# Altium PCB PCB_ANALOG.PcbDoc (part 3 of 3)
Units mil, origin at the board's own origin, x right, y up, seen from the top; angles counter-clockwise.
Board outline 2560.08 x 1580 mil, 4 copper layers (Top Layer, Layer 2(GND), Layer 3(GND), Bottom Layer), stack 61.583 mil thick; 99 components, 80 nets, 399 pads, 88 vias.
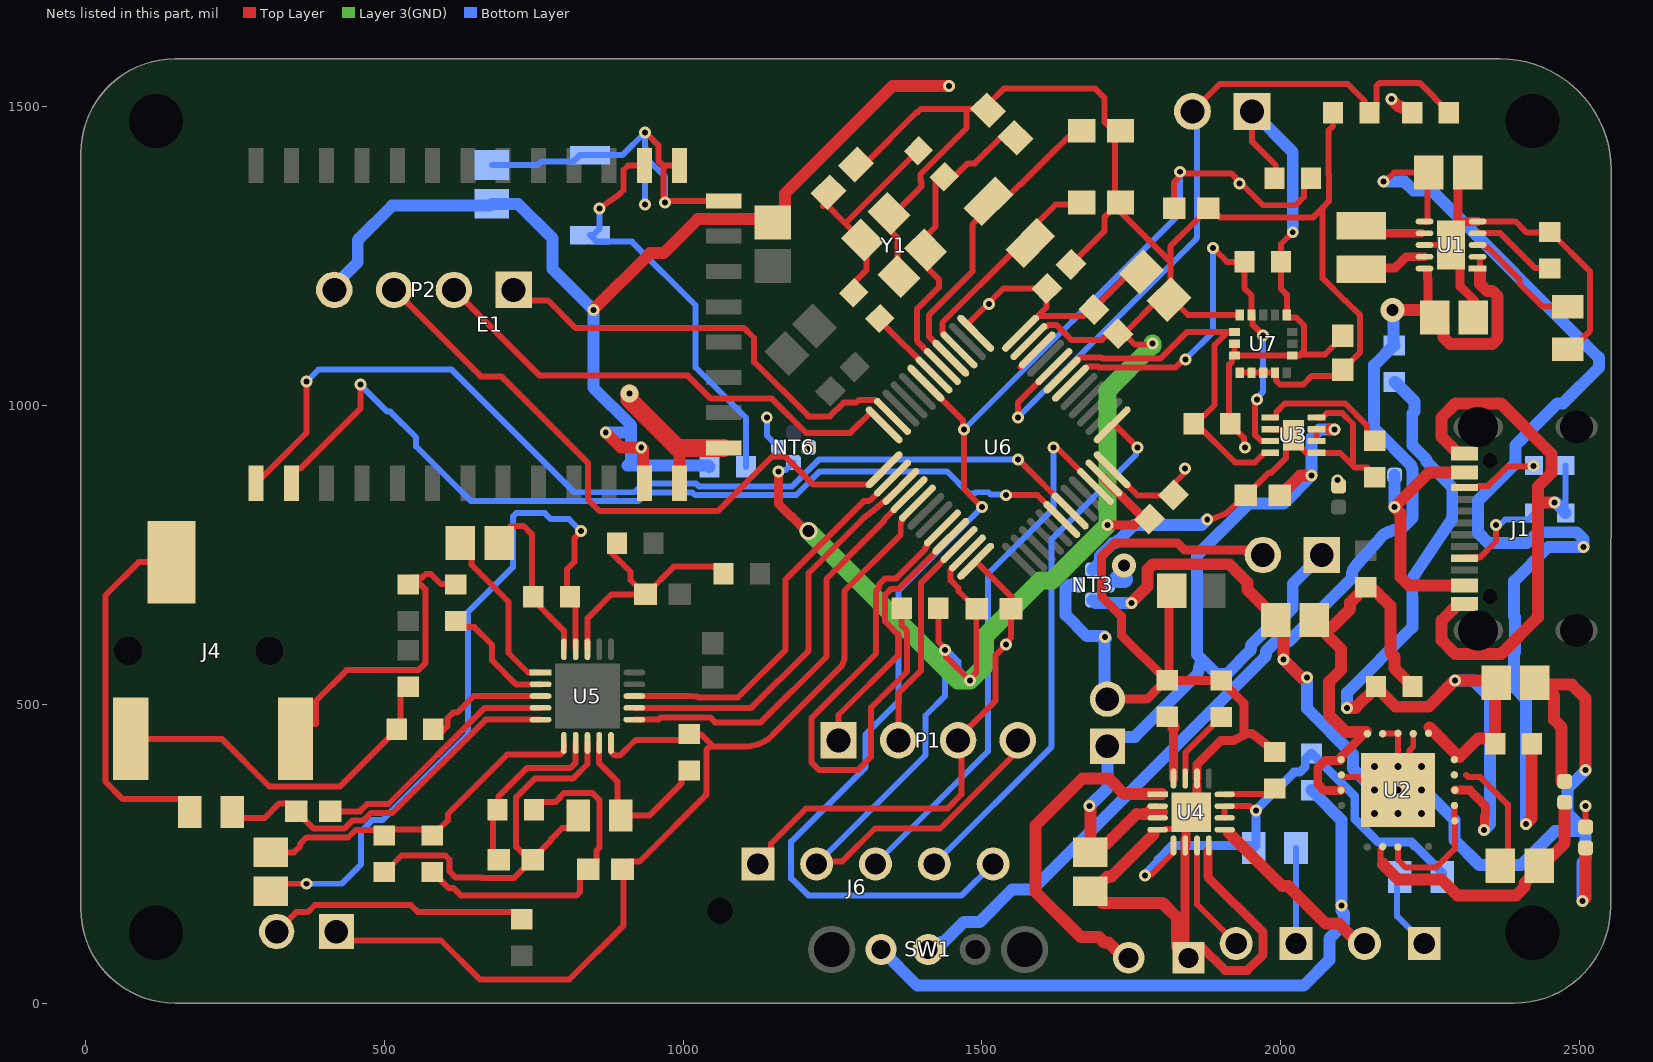
[diagram p4: the nets of this part, all layers, seen from the top]

## Via types
v1: diameter 20, hole 10, Top Layer to Bottom Layer, 74 vias
v2: diameter 23.62, hole 11.81, Top Layer to Bottom Layer, 9 vias
v3: diameter 40, hole 20, Top Layer to Bottom Layer, 3 vias
v4: diameter 30/30/30/30 (per signal layer), hole 10, Top Layer to Bottom Layer, tented bottom, 1 vias
v5: diameter 30, hole 20, Top Layer to Bottom Layer, 1 vias

## Nets (pads, with @x,y where several pads share a name; then routed paths per layer and width w, separated by ;. In a path a pad name is that pad's centre, name@x,y a point inside that pad or via, vN(x,y) a via of type N, cw(c..) or ccw(c..) an arc to the next point about the centre after c; other vN are vias at no path point) (continued)
BGND: C6.1 C8.1 J2.2 J3.2 NT3.1 R11.1 R14.1 R15.1 R16.1 U4.4 U4.6 U4.8 U4.14 U4.17 | length 2531.7
  Top Layer w10: U4.4@1805.73,290.47 1807.19,291.93 1821.93,291.93 1835.96,305.96 1840.16,301.77 U4.6@1840.16,263.97
  Top Layer w15: J2.2@1710.15,508.89 1776.21,508.89 1798.49,531.18 1799.54,531.18 1807.47,539.1 R15.1@1807.47,540.15 ; R15.1@1810,540.58 1808.95,540.58 1771.2,578.32 1770.46,578.32 1733.17,615.61 1733.17,647.94 1700,681.11 1700,747.74 1721.96,769.71 1827.21,769.71 1838.91,758 1961.25,758 J3.2@1969.25,750 ; R15.1@1810,541.63 1812.85,544.48 1812.85,686.41 C6.1@1816.44,690 ; R15.1@1810.43,540.15 R14.1@1899.85,540.15 ; U4.6@1840,273.89 1840,81.56 R16.1@1845.51,76.05 ; U4.6@1841.73,263.97 1841.73,310.98 U4.17@1850,319.25 ; U4.17@1850,321.05 1859.84,330.89 U4.14@1859.84,366.48 ; U4.14@1859.84,376.03 1859.84,399.84 1900,440 1917.43,440 1921.08,440 1924.33,441.68 1940.23,449.93 1942.26,450.98 1952.13,450.98 1979.54,429.98 R11.1@1989.25,420.58 ; R16.1@1865.54,96.08 1906.68,54.94 1944.01,54.94 1970.41,81.34 1970.41,118.66 1877.96,211.11 U4.8@1877.96,254.43 ; R14.1@1900.15,540.15 1900.9,540.15 1910.46,530.6 1910.46,529.85 1938.38,501.93 1938.38,453.51
  Top Layer w20: 1786.93,285.18 1786.93,282.2 1716.67,211.94 1709.8,211.94 1685.38,187.52 C8.1@1681.41,187.52 1701.11,167.82 1802.16,167.82 1826.71,143.27 1826.71,94.84 R16.1@1840,81.56
  Bottom Layer w20: NT3.1@1650.02,700 1645.86,700 1640,694.14 1640,650 1675.67,614.33 1704.08,614.33 v1(1705.67,612.74) ; v1@1707.28,610 1706.88,610 1705,608.12 1705,513.74 J2.2@1710,508.74
BOOT0: J5.2 R36.1 R37.2 U6.44 | length 1285
  Top Layer w10: v1(1560,980) 1560.14,980.14 1560.14,1005 U6.44@1620.4,1065.26 ; J5.2@1852.11,1492.14 1898.01,1538.05 2111.95,1538.05 2140,1510 2140,1498.63 R36.1@2148.63,1490 2160,1501.37 2160,1534.14 2165.86,1540 2232.21,1540 2281.16,1491.05 R37.2@2281.16,1490
  Bottom Layer w10: v1(1560,980) 1857.07,1277.07 ccw(c1850,1284.14) 1858,1278.14 ccw(c1850,1284.14) 1860,1284.14 1860,1480.11 ccw(c1850,1480.11) 1857.09,1487.16 J5.2@1852.11,1492.14
BOOT1: R38.1 U6.20 | length 886.4
  Top Layer w10: R38.1@1365.79,661.23 1365.79,632.16 1375,622.94 1375,555 1314.49,494.49 1314.49,412.25 1292.24,390 1227.76,390 1214.49,403.28 1214.49,476.72 1322.98,585.21 1322.98,689.91 1328,694.94 1328,701 1338,711 1356.77,711 1405.93,760.16 1405.93,763.21 1407.92,765.19 1408.48,765.75 1408.48,769.82 U6.20@1433.88,795.22
DGND: C18.1 C19.1 C20.1 C21.2 C22.1 C23.1 C24.1 C25.1 C26.1 C29.2 C30.1 J6.2 NT6.1 P1.4 R36.2 R38.2 U6.23 U6.35 U6.47 U7.5 U7.9 U7.10 U7.11 U7.12 Y1.2 Y1.4 | length 5549.6
  Top Layer w10: J6.2@1223.46,233.1 1227.78,237.43 1266.02,237.43 1321.1,292.51 1430.03,292.51 1550.24,412.71 1550.24,430.24 P1.4@1560,440 ; C25.1@1289.41,1402.99 1302.99,1402.99 1390.47,1490.47 1391.95,1490.47 1397.69,1496.21 1474.44,1496.21 ; Y1.2@1344.66,1321.54 1344.66,1320.74 Y1.2@1347.83,1317.57 ; Y1.2@1349.3,1316.89 1398.69,1366.28 1398.69,1370.43 1398.69,1373.95 1397.52,1375.12 1397.52,1387.55 1474.44,1464.46 1474.44,1480.56 1473.97,1481.03 1473.97,1494.17 1476.01,1496.21 1508.18,1496.21 C26.1@1510.22,1494.17 1510.22,1503.74 1537.31,1530.83 1688.83,1530.83 1704.74,1514.92 1704.74,1474.92 1714.06,1465.6 1726.05,1465.6 C30.1@1731.9,1459.76 1722.55,1450.41 1722.55,1350 C29.2@1732.55,1340 ; Y1.2@1351.74,1314.46 1347.45,1310.17 1347.45,1292.42 1358.58,1281.28 1358.58,1218.53 Y1.4@1361.37,1215.75 ; R38.2@1426.94,661.23 1426.94,605.32 1438.33,593.93 v1(1438.33,591.23) 1440.25,589.31 1440.25,579.75 v1(1480,540) 1480,542.43 1490.47,552.9 C22.1@1490.47,660 ; U6.23@1475.64,753.46 1475.64,752.97 1447.69,725.03 1447.69,707.52 1460.75,694.47 1460.75,689.73 C22.1@1490.47,660 ; C22.1@1491.39,660 C22.1@1490.47,660 ; U6.47@1578.64,1107.02 1604.04,1132.42 1608.11,1132.42 1610.65,1134.96 1624.58,1134.96 1649.54,1110 1700.72,1110 1711.01,1120.29 C24.1@1727.61,1120.29 C24.1@1737.63,1120.29 ; C20.1@1649.1,1236.25 1704.74,1291.89 1704.74,1315.08 1729.66,1340 C29.2@1732.55,1340 ; v1(1785,1104.1) 1783.09,1102.18 1760.38,1102.18 1760.11,1101.91 1756.01,1101.91 C24.1@1737.63,1120.29 ; U7.9@1931.39,1055.04 U7.10@1951.07,1055.04 U7.11@1970.76,1055.04 U7.12@1990.44,1055.04 1992.33,1053.15 1992.33,1041.67 1998.72,1035.28 2037.73,1035.28 2052.06,1049.61 2094.05,1049.61 C19.1@2104.03,1059.59 2104.03,1060.51 2132.89,1089.37 2132.89,1151.05 2108.06,1175.88 2106.89,1175.88 2070,1212.77 2070,1331.01 ; U7.5@1931.39,1151.5 1844.84,1151.5 C21.2@1815.75,1180.59 ; 2087.48,1467.91 2080,1460.44 2080,1387.03 2080.53,1386.49 2080.53,1341.55 2070,1331.01 ; C29.2@1732.55,1340 1730.38,1337.83 1730.38,1325.08 1755.36,1300.1 1815.75,1239.68 ; C24.1@1737.63,1120.29 1795.13,1177.78 C21.2@1812.95,1177.78 C21.2@1815.75,1180.59 ; C21.2@1815.75,1180.59 1815.75,1239.68 ; 1815.75,1239.68 1815.75,1267.14 1864.74,1316.13 1864.74,1317.04 1877.69,1330 1879.53,1330 1892.48,1317.04 1896.3,1317.04 1898.34,1315 2053.99,1315 2070,1331.01
  Top Layer w15: v1(1160,890) 1160,835 1180.92,814.08 1181.86,814.08 1205.94,790 v5(1210,790) ; U6.35@1703.91,878.74 C23.1@1772.65,810 ; v1(1710.21,800) 1755.21,800 1765.21,810 C23.1@1780,810
  Layer 3(GND) w30: v5(1210,790) 1460,540 v1(1480,540) 1505,565 1505,614.5 1597.75,707.25 1617.46,707.25 v1(1710.21,800) 1710.21,1025.21 1785,1100 v1(1785,1104.1)
  Bottom Layer w10: v1(1160,890) 1161.91,891.91 1171.24,891.91 1184.32,905 NT6.1@1185,905 ; J6.2@1223.46,233.1 1405.51,415.16 1405.51,481.56 1438.33,514.39 1438.33,587.59 1441.97,591.23 1441.04,591.23 1460.52,571.75 1460.52,559.48 v1(1480,540)
DVDD: C17.2 C19.2 C20.2 C21.1 C22.2 C23.2 C24.2 E1.12 FB1.1 J5.1 J6.1 NT5.2 P1.3 P2.4 R35.2 R37.1 R39.2 R40.1 R41.1 U6.1 U6.24 U6.36 U6.48 U7.1 U7.7 U7.8 U7.14 | length 4499.5
  Top Layer w10: J6.1@1125.03,233.1 1147.23,255.31 1147.23,267.23 1205.62,325.62 1441.94,325.62 1465.8,349.49 1465.8,434.2 P1.3@1460,440 ; P1.3@1460.52,440 1460.52,443.7 1522.99,506.16 1522.99,582.45 v1@1542.59,602.06 ; U6.24@1489.56,739.54 1550,679.1 1550,660 C22.2@1548.61,660 ; U6.1@1489.56,1120.93 1475.84,1134.65 1475.84,1135.84 1535.79,1195.79 C20.2@1608.64,1195.79 1607.99,1195.14 1607.99,1164.21 1590.12,1146.34 1590.61,1146.34 1594.51,1150.23 1670.15,1150.23 1680.67,1160.75 C24.2@1687.15,1160.75 1687.15,1161.77 1749.15,1223.76 C21.1@1766.97,1223.76 ; v1(1540,600) 1540,602.71 1548.37,611.07 1548.37,652.01 C22.2@1552.48,656.13 ; U6.36@1740,870 1760.19,849.81 1819.81,849.81 C23.2@1820.46,850.46 1820.46,868.78 1838.09,886.41 1838.09,893.09 v1(1840,895) ; U7.7@1922.53,1103.27 U7.8@1922.53,1083.59 ; v1(1940,930) 1938.09,931.91 1938.09,946.1 1915.56,968.63 R41.1@1915.56,969.68 1913.59,971.64 1913.59,1068.42 1918.67,1073.5 1918.67,1081.7 1920.56,1083.59 U7.8@1922.53,1083.59 ; J5.1@1952.11,1492.14 1952.11,1441.34 1991.57,1401.88 1991.57,1382.15 R39.2@1989.42,1380 ; U7.1@2010.13,1149.53 2012.02,1147.64 2025.47,1147.64 2032.36,1140.75 2038.75,1134.36 2038.75,1091.86 2032.36,1085.48 2073.61,1085.47 2104.03,1115.89 C19.2@2104.03,1116.81 ; U7.1@2010.13,1151.5 2010.13,1185.56 2000.26,1195.43 2000.26,1270.26 v1(2020,1290) ; 2032.36,1083.59 U7.14@2018.98,1083.59 U7.8@1922.53,1083.59
  Top Layer w20: v1(850,1160) 944.98,1254.98 967.66,1254.98 1024.47,1311.79 1144.65,1311.79 FB1.1@1150,1306.44 1151.99,1306.44 1170.63,1325.08 1170.63,1355.08 1350.55,1535 v1(1445,1535) ; v1(870.62,955.24) 895.86,930 v1(930,930) 932.78,927.22 932.78,872.5 E1.12@935.28,870 ; v1(2185,1512.56) 2197.56,1500 2201.38,1500 2203.42,1497.96 2213.1,1497.96 2220,1491.05 R37.1@2220,1490
  Bottom Layer w20: P2.4@416.49,1193.51 416.49,1200.69 455.69,1239.89 455.69,1277.06 513.27,1334.65 677.16,1334.65 C17.2@680,1337.49 723.67,1337.49 781.66,1279.5 781.66,1228.34 v1(850,1160) 850,1030.14 913.15,966.99 913.15,956.24 ; v1(870.62,955.24) 913.15,955.24 913.15,905.86 ; 912.44,905.15 907.29,900 ; v1(930,930) 930,920 910,900 907.29,900 ; R35.2@1044.04,897.58 1041.62,900 907.29,900 ; J5.1@1952.11,1492.14 2020,1424.25 v1(2020,1290)
  other v1: 2095,875.11 1511.97,1170
GBUCK: C1.1 C2.1 R4.1 R5.1 U1.5 U1.8 U1.11 | length 698.2
  Top Layer w10: U1.8@2240.41,1268.66 U1.11@2267.7,1268.66 ; U1.5@2329.23,1308.03 2392.85,1308.03 2411.5,1289.37 2448.68,1289.37 R5.1@2450.47,1291.16 ; R5.1@2450,1290.58 2450.47,1291.05 R5.1@2450.47,1291.16 ; R4.1@2473.11,1094.57 2486.89,1094.57 2517.48,1125.16 2517.48,1224.15 R5.1@2450.47,1291.16
  Top Layer w15: U1.11@2284.82,1255.34 2299.91,1240.25 2299.91,1199.52 2324.35,1175.09 2324.35,1149.35 C1.1@2322.31,1147.32 ; U1.11@2284.82,1268.66 2284.82,1280.16 cw(c2299.82,1280.16) 2289.21,1290.76 2302.09,1303.64 cw(c2312.69,1293.03) 2312.69,1308.03 U1.5@2329.23,1308.03 ; U1.11@2295.51,1302.5 2295.51,1319.14 2296.6,1320.23 2296.6,1374.09 C2.1@2312.51,1390
GND: C17.1 E1.13 E1.14 E1.21 E1.22 J1.A1-B12 J1.B1-A12 NT3.3 NT4.1 NT6.2 NT6.4 R2.1 R6.1 SW2.2 | length 2159.5
  Top Layer w10: v1(936.32,1456.78) 937.44,1456.78 958.68,1435.54 958.68,1409.65 966.83,1401.5 ; E1.22@994.33,1401.5 966.83,1401.5 ; E1.21@1068.15,1342.44 975.15,1342.44 974.62,1341.91 968.09,1341.91 967.56,1342.44 968.09,1342.97 968.09,1348.98 966.83,1350.24 966.83,1401.5 ; NT4.1@2510,295 v1(2510,330)
  Top Layer w20: 990.94,929.06 994.33,925.67 E1.13@994.33,870 ; J1.A1-B12@2307.68,667.8 2296.85,667.8 2292.44,663.39 2292.22,663.39 2268.98,640.14 2268.98,607.26 2292.22,584.02 2368.41,584.02 2430,645.61 2430,838.11 ; J1.B1-A12@2307.68,919.76 2296.85,919.76 2292.44,924.17 2292.22,924.17 2268.98,947.42 2268.98,980.3 2292.22,1003.54 2368.41,1003.54 2452.63,919.32 2452.63,886.79 2430,864.16 2430,838.11 ; v1(2458.18,838.11) 2430,838.11
  Top Layer w30: v4(910,1020) 910,1010 990.94,929.06 E1.14@1068.15,929.06
  Bottom Layer w10: C17.1@680,1402.51 757.06,1402.51 762.71,1408.17 816.1,1408.17 826.85,1418.91 898.45,1418.91 v1(936.32,1456.78) 936.32,1431.78 938.09,1430.01 938.09,1411.91 940,1410 ; v1(936.32,1336.78) 936.32,1403.61 942.71,1410 970,1382.71 v1(970,1340) ; v1(1140,980) 1140,950 NT6.4@1160,930 ; NT3.3@1710,700 1717.4,700 1727.4,710 ; v3(1737.5,732.21) 1738.12,731.58 1738.12,710 ; R2.1@2476.59,820 R6.1@2476.59,900
  Bottom Layer w20: v1(2458.18,838.11) 2459.59,838.11 2471.71,825.99 2471.71,824.87 R2.1@2476.59,820
  Bottom Layer w30: 1727.4,710 1738.12,710
  other v1: 1211.64,929.35
IAOUT: C13.2 R22.2 U5.19 | length 1202.5
  Top Layer w10: C13.2@310,187.49 322.51,200 v1(370,200) ; R22.2@806.1,684.48 806.1,726.49 817.93,738.31 817.93,777.93 829.13,789.13 v1(829.13,790) ; R22.2@810.58,680 820.32,670.26 U5.19@820.32,592.39
  Bottom Layer w10: v1(370,200) 429.04,200 461.45,232.4 461.45,288.25 479.68,306.48 496.82,306.48 640,449.66 640,654.36 715.14,729.5 715.14,814.14 720.99,820 768.71,820 778.71,810 809.13,810 v1(829.13,790)
LA: J4.3 R23.1 R26.1 | length 537
  Top Layer w10: J4.3@351.42,442.36 375.94,466.89 385.94,466.89 385.94,505.94 437.23,557.23 556.93,557.23 568.86,569.16 568.86,692.77 R23.1@550.53,711.1 ; R23.1@540,700.58 551.9,712.48 563.96,712.48 569.67,718.2 577.96,718.2 594.75,701.4 619.18,701.4 R26.1@620,700.58
LOD+: U5.12 U6.15 | length 673
  Top Layer w10: U5.12@918.37,494.34 1114.34,494.34 1210,590 1210,720 1300.96,810.96 1323.69,828.89 ccw(c1314.4,840.67) 1324.35,829.44 U6.15@1364.28,864.82
LOD-: U5.11 U6.16 | length 700.4
  Top Layer w10: U5.11@918.37,474.66 958.46,474.66 962.19,478.39 1045.28,478.39 1053.67,470 1130,470 1240,580 1240,710 1272.85,742.85 1272.85,743.44 1335.88,806.47 1335.88,808.58 U6.16@1378.2,850.9
NetC1_2: C1.2 R3.2 SW1.2 U1.1 U1.2 U1.10 | length 1946.6
  Top Layer w10: U1.2@2329.23,1248.97 2332.79,1248.97 2333.02,1248.75 2333.02,1224.06
  Top Layer w15: 2245.29,1212.38 2245.29,1224.06 ; C1.2@2246.45,1158.15 2246.45,1211.22
  Top Layer w20: v3(2186.79,1160.25) C1.2@2244.36,1160.25 ; C1.2@2246.45,1158.15 C1.2@2257.29,1147.32 2271.99,1132.62 2271.99,1114.43 2283.7,1102.71 2353.56,1102.71 2362.91,1112.06 2362.91,1182.57 2353.6,1191.89 2344.74,1191.89 2333.02,1203.6 2333.02,1224.06
  Bottom Layer w20: SW1.2@1410,90 1418.66,90 1431.41,102.75 1436.44,102.75 1469.69,136 1496,136 1550.54,190.54 1584.73,190.54 1974.18,580 1974.18,582.26 1975,583.08 1975,588.59 1991.76,605.35 2013.08,605.35 2118.94,711.2 2118.94,716.47 cw(c2138.94,716.47) 2123.84,729.59 2167.35,779.67 cw(c2190,760) 2179.76,788.2 2186.32,790.58 cw(c2193.15,771.78) 2193.15,791.78 2199.6,791.78 2220.6,812.78 2220.6,894.04 2219,895.65 2219,898.93 2156.14,961.79 2156.14,1067.77 2188.95,1100.58 R3.2@2190,1100.58 2188.4,1102.18 2188.4,1158.64 v3(2186.79,1160.25)
NetC2_2: C2.2 R1.1 U1.6 | length 1937.1
  Top Layer w10: v1(2171.59,1374.6) 2174.3,1374.6 2189.7,1390 C2.2@2247.49,1390 2245.75,1388.26 2245.75,1308.03 U1.6@2240.41,1308.03
  Top Layer w20: v1(2410,300) 2419.89,309.89 R1.1@2419.89,434
  Bottom Layer w20: v1(2171.59,1374.6) 2206.99,1374.6 2221.59,1360 2252.11,1360 2532,1080.11 2532,1063.54 2472,1003.54 2462.7,1003.54 2392.63,933.48 2392.63,903.81 2330,841.18 2330,787.57 2347.57,770 2411.65,770 2429.75,788.11 2495.07,788.11 2506.78,776.39 v1(2506.78,763.68) 2505.23,763.68 2447.75,763.68 2390.43,706.36 2390.43,647.51 2391.65,646.29 2391.65,587.44 2390.43,586.22 2390.43,528.6 2410,509.04 v1(2410,300)
NetC4_2: C4.2 R7.1 R8.1 U2.1 U2.3 U2.20 | length 743.5
  Top Layer w15: U2.3@2100.8,356.56 2100.05,355.81 2073,355.81 2061.83,366.98 2061.83,393.79 2074.58,406.54 2099.6,406.54 U2.1@2100.8,407.74 2100.8,412.38 U2.20@2142.57,454.15
  Top Layer w20: C4.2@2056.23,641.26 2056.23,637.29 2100.92,592.6 2100.92,558.08 2080.92,538.08 2080.92,481.93 2108.7,454.15 U2.20@2142.57,454.15 ; C4.2@2074.83,622.66 2081.74,629.57 2085.94,629.57 2115.74,659.37 2115.74,670.35 2141.29,695.9 R8.1@2142.35,695.9 2150.3,692.9 cw(c2146.87,673.2) 2161.76,686.55 2167.67,679.96 ; 2169.49,678.11 2176.9,671.16 2183.22,664.84 2183.22,586.78 2190,580 2190,560.58 2212.62,537.96 2213.68,537.96 2220.58,531.05 R7.1@2220.58,530
NetC5_2: C5.2 U2.14 | length 206.3
  Top Layer w10: 2310.17,382.15 2313.87,378.45 2333.76,378.45 2380,332.2 2380,234.14 2371.68,225.81 C5.2@2367.49,230
NetC7_1: C7.1 NT3.4 R13.2 U3.1 U3.4 U3.6 U3.9 | length 800.3
  Top Layer w10: v1(1876.95,809.37) 1878.55,807.77 1907.32,818.88 1927.52,837.04 C7.1@1941.39,850 ; C7.1@1942.31,850 1979.73,887.42 1983.84,887.42 2008.5,912.09 2008.5,937.76 2013.32,942.57 U3.9@2021.22,950.47 ; U3.6@1982.44,960.31 2011.38,960.31 U3.9@2021.22,950.47 ; U3.4@2060,980 2060.32,980.32 2069.96,980.32 2076.87,987.23 2102.77,987.23 2120.73,969.27 2120.73,899.27 2099.06,920.94 U3.1@2060,920.94 2059.68,921.26 2042.56,921.26 2021.22,942.6 U3.9@2021.22,950.47 ; 2123.57,896.43 2144.98,896.43 2144.98,892.07 R13.2@2156.89,880.16
  Bottom Layer w20: NT3.4@1685,725 1697.5,737.5 1697.5,748.78 1718.72,770 1722.64,770 1727.02,774.39 1728.57,774.39 1754.18,800 1867.57,800 v1(1876.95,809.37)
NetC12_1: C12.1 U5.1 | length 284.5
  Top Layer w10: C12.1@627.49,770 646.15,751.33 646.15,733.35 707.96,671.54 707.96,586.06 740.63,553.4 U5.1@761.63,553.4
NetC12_2: C12.2 R22.1 U5.20 | length 291.3
  Top Layer w10: C12.2@692.51,770 711.43,788.92 711.43,798.92 733.08,798.92 747.07,784.93 747.07,682.36 R22.1@749.42,680 ; R22.1@746.72,677.3 800.63,623.4 U5.20@800.63,592.39
NetC14_1: C14.1 R31.2 U5.5 | length 622.6
  Top Layer w10: R31.2@245.43,320 255.43,310 300,310 324.54,334.54 332.83,334.54 333.27,334.09 339.6,334.09 C14.1@352.56,321.14 ; C14.1@353.47,321.14 382.33,292.28 433.17,292.28 447.03,306.14 465.28,306.14 477.53,318.39 513.28,318.39 669.55,474.66 U5.5@761.63,474.66
NetC14_2: C14.2 U5.4 | length 423.6
  Top Layer w10: C14.2@409.78,321.14 459.06,321.14 471.31,333.39 507.06,333.39 668.02,494.34 U5.4@761.63,494.34
NetC15_2: C15.2 R25.1 R30.1 | length 561.2
  Top Layer w10: R25.1@580,219.42 581.05,219.42 607.94,192.53 616.25,192.53 628.79,180 821.66,180 827.52,185.86 827.52,211.07 840.47,224.03 C15.2@841.39,224.03 ; R30.1@750.58,324.03 750.58,325.08 762.48,336.98 787.26,336.98 793.98,343.7 793.98,345.12 800.36,351.51 848.77,351.51 860,340.28 860,260.33 855.26,255.59 855.26,236.98 C15.2@842.31,224.03
NetC25_2: C25.2 R20.1 R42.1 Y1.3 | length 390.3
  Top Layer w10: 1233.97,1333.97 1243.38,1343.38 C25.2@1243.38,1356.96 ; C25.2@1242.35,1343.38 1241.92,1342.96 1241.92,1334.4 1271.62,1304.7 ; R42.1@1285.72,1188.96 1285.72,1205.8 1307.15,1227.23 1307.15,1269.17 1303.29,1273.03 1300.12,1276.2 Y1.3@1300.12,1276.99 1299.33,1276.99 1271.62,1304.7 ; R20.1@1393.74,1426.13 1393.05,1426.13 1271.62,1304.7
NetDS1_1: DS1.1 R10.1 | length 132.2
  Bottom Layer w10: R10.1@2199.38,211.36 2194.57,206.54 2194.57,145.43 DS1.1@2240,100
NetDS1_2: DS1.2 U4.9 | length 303.6
  Top Layer w20: 1913.07,285.18 2002.3,195.95 2012.8,195.95 2075.48,133.27 2097.22,133.27 2130.49,100 DS1.2@2140,100
NetDS2_1: DS2.1 R12.1 | length 160
  Bottom Layer w10: DS2.1@2025.35,100 2025.43,100.08 R12.1@2025.43,260
NetDS2_2: DS2.2 U4.7 | length 191.1
  Top Layer w10: U4.7@1859.84,263.97 1859.84,165.51 DS2.2@1925.35,100
NetDS3_2: DS3.2 R34.2 | length 438.4
  Top Layer w10: DS3.2@320,120 352.6,152.6 372.33,152.6 384.26,164.53 544.63,164.53 556.67,152.48 718.1,152.48 R34.2@730,140.58
NetDS4_1: 
NetE1_23: E1.23 R35.1 SW2.1 | length 706.2
  Top Layer w10: v1(860,1330) 892.92,1353.3 900.35,1360.73 900.35,1394.07 907.78,1401.5 E1.23@935.28,1401.5
  Bottom Layer w10: v1(860,1330) 860,1295.8 849.25,1285.06 SW2.1@844.57,1285.06 855.32,1274.31 914.15,1274.31 1020.94,1167.52 1020.94,1063.71 1105.2,979.45 R35.1@1105.2,897.58
NetJ1_A5: J1.A5 R2.2 | length 168.4
  Top Layer w10: J1.A5@2307.68,744.57 2308.58,745.47 2332.86,745.47 2360,772.61 v1@2360,803.58
  Bottom Layer w10: v1(2360,800) 2360,801.91 2367.9,801.91 2375,809.01 2413.54,809.01 2423.41,818.89 R2.2@2423.41,820
NetJ1_B5: J1.B5 R6.2 | length 131.2
  Top Layer w10: J1.B5@2307.68,862.68 2308.58,863.58 2329.2,863.58 2331.17,865.55 2347.3,865.55 2379.84,898.09 2421.5,898.09 v1(2422.63,899.22)
  Bottom Layer w10: v1(2422.63,899.22) R6.2@2423.41,900
NetL1_1: L1.1 U1.7 | length 106.3
  Top Layer w15: L1.1@2146.93,1288.34 U1.7@2235.53,1288.34
  Top Layer w20: L1.1@2134.43,1300.85 L1.1@2146.93,1288.34
NetL1_2: L1.2 U1.9 | length 114.7
  Top Layer w15: L1.2@2134.43,1227.96 2136.78,1230.32 2191.49,1230.32 2210.15,1248.97 U1.9@2240.41,1248.97
NetR4_2: R4.2 U1.3 | length 197.7
  Top Layer w10: U1.3@2329.23,1268.66 2338.89,1268.66 2342.89,1264.65 2345.84,1264.65 2399.18,1211.31 2399.18,1204.21 2437.96,1165.43 R4.2@2480,1165.43
NetR5_2: R5.2 U1.4 | length 145.2
  Top Layer w10: U1.4@2329.23,1288.34 2367.14,1288.34 2425.48,1230 2449.42,1230 R5.2@2450,1229.42
NetR9_1: R9.1 R10.2 R12.2 U4.5 U4.10 U4.11 | length 889.2
  Top Layer w10: v1(1772.61,213.71) 1774.52,215.62 1783.88,215.62 1820.47,252.22 U4.5@1820.47,263.97 ; U4.10@1906.03,310.16 U4.11@1906.03,329.84 1948.35,329.84 1955.48,322.71 v1(1958.18,322.71)
  Bottom Layer w15: v1@1772.61,214.92 1772.61,215.06 1794.78,237.23 1794.78,240.45 1818.37,264.05 1950.52,264.05 R12.2@1954.57,260 1958.58,264.01 v1@1958.58,321.76 ; v1(1958.18,322.71) 2022.36,386.89 2032.11,386.89 2040.9,395.68 2040.9,408.34 2050.3,417.74 R9.1@2051.35,417.74 ; R9.1@2052.41,417.74 2123.71,346.43 2123.71,308.65 2162.82,269.54 2218.96,269.54 2270.25,218.25 R10.2@2270.25,211.36
NetR11_2: R11.2 U4.12 | length 88.1
  Top Layer w10: U4.12@1906.03,349.53 1917.78,349.53 1918.07,349.82 1980.4,349.82 R11.2@1990,359.42
NetR13_1: R13.1 U3.5 | length 223.3
  Top Layer w10: U3.5@1982.44,980 1982.76,980.32 1992.4,980.32 1992.4,989.07 2006.78,1003.45 2107.77,1003.45 2143.93,967.28 2143.93,953.23 2155.84,941.32 R13.1@2156.89,941.32
NetR14_2: R14.2 U4.15 | length 115.9
  Top Layer w10: U4.15@1840.45,388.07 1840.45,419.4 1887.04,466 1887.04,466.94 1898.95,478.84 R14.2@1899.89,478.84
NetR15_2: R15.2 U4.16 | length 106.9
  Top Layer w15: U4.16@1820.47,376.03 1820.47,460.66
  Top Layer w20: R15.2@1810,479.42 1816.9,472.52 1818.35,469.62 cw(c1800.47,460.66) 1820.47,460.66
NetR16_2: R16.2 U4.1 | length 567.8
  Top Layer w20: R16.2@1745.51,76.05 1737.66,76.05 1712.19,101.52 1705.11,101.52 1695.7,110.93 1665.07,110.93 1589.5,186.5 1589.5,297.28 1668.43,376.21 1711.84,376.21 1738.05,350 1772.64,350 1773.1,350.46 U4.1@1801.02,350.46
NetR26_2: R26.2 U5.2 | length 200.7
  Top Layer w10: R26.2@620,639.42 630,629.42 650.62,629.42 680.63,599.41 680.63,573.4 720.32,533.71 U5.2@761.63,533.71
NetR28_2: R28.2 U5.3 | length 204.3
  Top Layer w10: R28.2@581.94,458.54 591.06,449.42 606.21,464.57 606.21,477.2 615.35,486.34 622.31,486.34 650,514.03 U5.3@748.3,514.03
NetU2_8: U2.8 U2.11 U2.12 | length 207.7
  Top Layer w10: U2.8@2196,261.36 2196,239.87 2208.49,227.39 2260.28,227.39 2291.32,258.43 2291.32,305.26 2290.84,305.73 2290.84,330.61 U2.12@2290.49,330.97
NRST: C18.2 J6.5 R39.1 U6.7 | length 2282.6
  Top Layer w10: U6.7@1406.04,1037.42 1468.09,975.37 1468.09,961.91 v1(1470,960) 1470,860 v1(1500,830) ; C18.2@1821.39,1330 1821.39,1369.76 cw(c1831.39,1369.76) 1823.39,1375.76 cw(c1831.39,1369.76) 1824.33,1376.85 1834.1,1386.62 ccw(c1827,1393.65) 1835.68,1388.69 1836,1388.51 1916.8,1388.51 1932.67,1372.63 1970.15,1335.16 2024.92,1335.16 2038.68,1348.92 2038.68,1368.1 R39.1@2050.58,1380
  Bottom Layer w10: v1(1470,960) 1828.33,1318.33 ccw(c1821.26,1325.4) 1829.26,1319.4 ccw(c1821.26,1325.4) 1831.26,1325.4 v1(1831.26,1391.22) ; v1(1500,830) 1360,690 1360,504.36 1305.51,449.88 1305.51,394.98 1180.9,270.37 1180.9,209.1 1210,180 1465.63,180 J6.5@1518.73,233.1
  other v1: 1931.26,1371.22
OPAMP+: C16.1 R30.2 U5.7 | length 302
  Top Layer w10: R30.2@689.42,324.03 R30.2@691.32,325.93 ; C16.1@691.39,240 682.32,249.07 682.32,316.93 R30.2@691.32,325.93 ; U5.7@820.32,435.66 820.32,402.33 812.01,394.03 739.08,394.03 691.32,346.27 R30.2@691.32,325.93
OPAMP-: R32.1 R33.2 U5.9 | length 288.1
  Top Layer w10: U5.9@859.69,435.66 859.69,401.72 890.12,371.29 890.12,319.34 R32.1@895.43,314.03 943.55,314.03 990.23,360.7 997.04,367.52 997.04,377.52 1008.95,389.42 R33.2@1010,389.42
OSC_IN_8M: C26.2 R20.2 U6.5 Y1.1 | length 526.9
  Top Layer w10: U6.5@1433.88,1065.26 1411.71,1087.42 1411.02,1087.42 1402.23,1096.21 1402.23,1096.82 1401.43,1097.69 1399.49,1099.66 1393.3,1105.85 ccw(c1386.17,1098.83) 1393.24,1105.91 1393.24,1106.52 1392.43,1107.39 1391.08,1108.76 1391.08,1112.73 1391.08,1161.08 1427.76,1197.76 1427.76,1211.31 1409.08,1229.99 1409.08,1256.33 1405.91,1259.5 Y1.1@1405.91,1260.29 1405.91,1282.91 1422.52,1299.53 1422.52,1343.67 1422.67,1343.82 1422.67,1378.88 1426.68,1382.89 1453.82,1382.89 1476.22,1405.29 1488.22,1405.29 1533.1,1450.18 1554.21,1450.18 C26.2@1556.25,1448.14
OSC_IN_32: C29.1 U6.3 Y2.2 | length 368.3
  Top Layer w10: U6.3@1447.74,1107.56 1433.77,1121.53 1433.77,1139.03 1555.66,1260.93 Y2.2@1566.76,1272.02 ; Y2.2@1580.73,1272.02 1569.88,1272.02 1569.88,1282.86 1623.44,1336.42 1663.87,1336.42 C29.1@1667.45,1340
OSC_OUT_8M: R42.2 U6.6 | length 131.2
  Top Layer w10: R42.2@1327.49,1143.8 U6.6@1419.96,1051.34 ; R42.2@1328.96,1145.27 R42.2@1328.96,1145.72
OSC_OUT_32: C30.2 U6.4 Y2.1 | length 540.2
  Top Layer w10: U6.4@1447.8,1079.18 1411.08,1115.89 1411.08,1151.08 1484.07,1224.07 1484.07,1302.86 1494.07,1312.86 1494.07,1336.99 1489.44,1341.62 1534.68,1341.62 1562.74,1369.68 1564.25,1369.68 1625.06,1430.49 1625.56,1430.49 1654.83,1459.76 C30.2@1666.8,1459.76
OUT: C15.1 DS3.1 R33.1 U5.10 U6.17 | length 1747.2
  Top Layer w10: DS3.1@420,120 435,105 595,105 660,40 810,40 900,130 900,222.64 C15.1@898.61,224.03 911.57,236.98 926.98,236.98 1038.86,348.86 1038.86,424.14 1044.72,430 1050,430 ; U5.10@879.37,435.66 879.37,424.66 ccw(c889.37,424.66) 889.37,414.66 890.51,414.66 ccw(c890.51,424.66) 897.57,417.57 917.88,437.88 cw(c924.93,430.79) 918.93,438.79 cw(c924.93,430.79) 924.93,440.79 1019.79,440.79 R33.1@1010,450.58 1025.28,450.58 cw(c1025.28,440.58) 1032.33,447.67 1040.31,439.69 1047.34,432.66 1050,430 ; 1105.81,430 1050,430 ; 1105.86,430 ccw(c1105.86,490.36) 1148.58,447.72 1262.3,561.44 ccw(c1243.74,580.02) 1270,580.02 1270,690 1364.17,784.17 1364.17,804.97 1366.72,807.51 1366.72,811.58 U6.17@1392.12,836.98
PA1: P2.1 U6.11 | length 767.9
  Top Layer w10: P2.1@716.49,1193.51 734.15,1175.85 774.15,1175.85 820.37,1129.63 1102.19,1129.63 1118.66,1113.16 1118.66,1073.3 1210,981.96 1245.56,981.96 1268.6,1005 1290.1,1005 1294.79,1009.69 1321.92,1009.69 1349.87,981.74 U6.11@1350.36,981.74
PA2: P2.2 U6.12 | length 841.9
  Top Layer w10: P2.2@616.49,1193.51 760,1050 1007.86,1050 1046.35,1011.52 1148.48,1011.52 1205.65,954.35 1279.93,954.35 1314.33,988.75 1315.51,988.75 U6.12@1336.44,967.82
PA3: P2.3 U6.13 | length 1077.1
  Top Layer w10: P2.3@516.49,1193.51 661.22,1048.78 695.84,1048.78 840.57,904.04 840.57,842.88 860.11,823.35 1057.97,823.35 1149.63,915 1170.36,915 1217.75,867.6 1310.55,867.6 1335.61,892.66 U6.13@1336.44,892.66
PB9: U6.46 | length 40.1
  Top Layer w10: U6.46@1564.61,1064.66 1592.56,1092.61 U6.46@1592.56,1093.1
"Power Ground": C3.1 C4.1 NT2.2 NT3.2 NT4.2 U2.2 U2.17 U2.18 U2.19 U2.21 | length 2197.2
  Top Layer w10: U2.2@2101.51,382.15 2101.51,381.5 2103.68,379.33 2103.68,378.45 2130.56,378.45 2152.45,356.56 v2(2156.63,356.56) ; U2.19@2170.41,451.05 2170.76,451.4 2195.64,451.4 U2.18@2196,451.05 ; v2(2196,356.56) 2215.09,375.65 U2.21@2215.09,413.57 ; v2(2196,395.93) U2.18@2196,451.05 ; U2.18@2196,451.76 U2.18@2196,451.05 ; U2.21@2196.83,396.87 2198.4,396.87 U2.21@2215.09,413.57 ; U2.17@2221.59,451.05 2221.59,429.16 2215.09,422.66 U2.21@2215.09,413.57
  Top Layer w20: v1(1750,670) 1776.89,696.89 1776.89,725.25 1786.2,734.57 1913.8,734.57 1944.19,704.18 1944.19,692.24 1991.21,645.23 C4.1@1991.21,641.26 2004.18,628.28 v1(2004.18,575.35) 2034.18,545.35 v1(2044.18,545.35) ; C3.1@2425.2,536.27 C3.1@2428.34,533.13 ; NT2.2@2470,371.36 2470,461.33 2457.27,474.05 2457.27,515.29 2442.57,529.99 2431.47,529.99 C3.1@2428.34,533.13 ; v1(2504.82,171.36) 2510,176.54 NT4.2@2510,260 ; v1(2510,390) 2510,510 2486.87,533.13 C3.1@2428.34,533.13
  Bottom Layer w20: NT3.2@1685,675 1690,670 v1(1750,670) ; v1(2004.18,575.35) 2034.18,545.35 v1(2044.18,545.35) 2044.18,492.76 2120.72,416.22 2120.72,392.47 v2(2156.63,356.56) ; v2(2235.37,356.56) 2236.35,356.56 2243.91,349 2248.55,349 2290.47,307.08 2290.47,273.28 2332.39,231.36 2402.24,231.36 2458.77,287.89 2510,287.89 ; v1(2504.82,171.36) 2504.82,235.36 2510,240.54 2510,287.89 ; v1(2510,390) 2480,360 2480,317.57 2497.57,300 2497.89,300 2510,287.89
  other v2: 2156.63,317.19 2196,317.19 2235.37,317.19 2156.63,395.93 2235.37,395.93
RA: J4.1 R24.1 R28.1 | length 597.8
  Top Layer w10: J4.1@75.83,442.36 228.2,442.36 308,362.56 425.85,362.56 520.78,457.49 R28.1@520.78,458.54 527.04,464.81 527.04,517.52 538.95,529.42 R24.1@540,529.42
REFOUT: C16.2 R27.1 R32.2 U5.8 | length 705.8
  Top Layer w10: R27.1@500,219.42 501.05,219.42 528.86,247.23 602.47,247.23 609.27,240.43 609.27,220.73 619.89,210.11 662.62,210.11 662.85,209.89 709.63,209.89 709.75,210 717.69,210 743.46,235.77 743.46,240 C16.2@748.61,240 748.61,242.07 779.22,272.68 779.22,274.5 797.92,293.2 809.88,293.2 824.57,307.89 R32.2@824.57,314.03 ; C16.2@742.52,240 720.85,261.68 720.85,344.87 752.35,376.38 815.93,376.38 840,400.45 U5.8@840,435.66
RL: J4.2 R31.1 | length 611.5
  Top Layer w10: J4.2@144,738 89,738 33.27,682.27 33.27,371.07 62.77,341.57 159.88,341.57 174.57,326.89 R31.1@174.57,320
SCL1: R40.2 U3.7 U6.42 U7.4 | length 816.3
  Top Layer w10: U6.42@1648.24,1037.42 1648.73,1037.42 1676.67,1065.36 1694.17,1065.36 1695.44,1064.1 1824.1,1064.1 v1@1840,1080 ; v1(1886.78,1263.68) 1910.09,1240.37 1939.1,1240.37 1939.1,1196.48 1951.07,1184.51 U7.4@1951.07,1151.5 1952.96,1149.61 1952.96,1134.98 1970.36,1117.58 v1(1970.36,1117.03) ; v1(1960,1010) 1960,1007.29 1956.57,1003.87 1956.57,951.26 1966.89,940.94 1982.13,940.94 U3.7@1982.44,940.63
  Bottom Layer w10: v1(1840.36,1077.03) 1886.78,1123.45 v1(1886.78,1263.68) ; v1(1960,1010) 1960,1012.71 1970.36,1023.07 v1(1970.36,1117.03)
SDA1: R41.2 U3.8 U6.43 U7.6 | length 647.2
  Top Layer w10: U6.43@1634.32,1051.34 1634.81,1051.34 1663.83,1080.36 1700.39,1080.36 1701.66,1079.1 1799.1,1079.1 1842.96,1122.96 1909.15,1122.96 U7.6@1918.75,1122.96 ; R41.2@1854.4,969.68 1855.13,968.95 1859.42,968.95 1923.37,905 1956.85,905 1972.8,920.94 U3.8@1982.44,920.94 ; R41.2@1859.42,971.05 1889.06,1000.69 1889.06,1100.98 1909.15,1121.07
SGNG: C5.1 NT2.1 U2.7 | length 468.5
  Top Layer w10: U2.7@2170.41,262.07 2170.41,261.42 2166.71,257.72 2166.71,238.01 2171.16,233.56
  Top Layer w20: 2171.16,233.56 2171.16,232.05 2195.82,207.39 2268.57,207.39 2295.95,180 2393.35,180 2408.09,194.75 2408.09,201.61 2432.51,226.03 C5.1@2432.51,230 ; C5.1@2434.71,227.8 2474.82,267.9 NT2.1@2474.82,336.36
"Shutdown control": U5.13 U6.14 | length 653.2
  Top Layer w10: U5.13@918.37,514.03 1003.46,514.03 cw(c1003.46,504.03) 1005.89,513.73 cw(c1003.46,504.03) 1005.95,513.71 1012.03,513.71 1020.27,513.56 1024.25,513.36 1025.95,511.66 1091.66,511.66 1171.61,591.61 1171.61,709.18 1302.43,840 1307.48,840 ccw(c1307.48,850) 1314.54,842.91 U6.14@1350.36,878.74
SW: C13.1 R25.2 R27.2 U5.6 | length 615.3
  Top Layer w10: C13.1@310,252.51 348.91,252.51 359.31,262.91 359.31,266.88 369.71,277.28 439.38,277.28 452.1,290 490.58,290 R27.2@500,280.58 510.56,291.14 R25.2@570.49,291.14 ; U5.6@800.63,435.66 800.63,421.99 794.77,416.13 705.66,416.13 606.62,317.1 606.62,306.15 R25.2@581.05,280.58 ; R25.2@570.49,291.14 580,281.63 R25.2@580,280.58 R25.2@581.05,280.58 ; R25.2@570.49,291.14 R25.2@581.05,280.58
SWDCLK: J6.4 U6.37 | length 896.7
  Top Layer w10: U6.37@1717.83,967.82 1719.42,969.4 1720.6,969.4 v1(1760,930)
  Bottom Layer w10: J6.4@1420.31,233.1 1616.59,429.39 1616.59,776.59 1758.09,918.09 1758.09,928.09 v1(1760,930)
SWDIO: J6.3 U6.34 | length 917.4
  Top Layer w10: v1(1620,930) 1621.91,928.09 1626.73,928.09 U6.34@1690,864.82
  Bottom Layer w10: J6.3@1321.88,233.1 1510,421.22 1510,718.23 1620,828.23 v1(1620,930)
UART1_RX: E1.1 U6.31 | length 1638.1
  Top Layer w10: E1.1@285.67,870 320,904.33 370,954.33 v1(370,1040) ; v1(1560,910) 1560.81,910 1647.23,823.58 U6.31@1647.72,823.58
  Bottom Layer w10: v1(370,1040) 390,1060 612.86,1060 817.86,855 919.08,855 933.57,869.5 1021.84,869.5 1026.34,865 1182.64,865 1227.64,910 v1(1560,910)
UART1_TX: E1.2 U6.30 | length 1539.4
  Top Layer w10: E1.2@344.72,870 344.72,887.03 352.22,894.53 359.69,894.53 460,994.83 v1(460,1035) ; v1(1540,850) 1593.01,850 U6.30@1633.57,809.44
  Bottom Layer w10: v1(460,1035) 505.21,989.79 510.21,989.79 553.51,946.49 553.51,931.6 645.11,840 925.29,840 939.78,854.5 1015.63,854.5 1020.13,850 1188.85,850 1228.85,890 1441.46,890 1478.19,853.27 1487.91,853.27 1489.64,855 1510.97,855 1515,850.97 1539.03,850.97 v1(1540,850)
UART3_RX: P1.2 U6.22 | length 369.5
  Top Layer w10: P1.2@1360,440 1360,518.79 1398.16,556.94 1398.16,703.82 U6.22@1461.72,767.38
UART3_TX: P1.1 U6.21 | length 444.8
  Top Layer w10: P1.1@1260,440 1260,482.35 1360,582.35 1360,616.73 1337.98,638.75 1337.98,683.7 1347.29,693.01 1360,693.01 1447.8,780.81 U6.21@1447.8,781.3
V_in_from_LiPo: R9.2 SW1.1 | length 1110.5
  Bottom Layer w20: SW1.1@1331.26,90 1391.79,29.47 2038.23,29.47 2081.2,72.45 2081.2,108.47 2106.03,133.29 2106.03,150.15 2101.21,154.97 v1(2101.21,163.27) 2101.21,306.72 2059.31,348.63 2059.31,349.68 2052.41,356.58 R9.2@2051.35,356.58
VBAT: C7.2 C8.2 J2.1 J3.1 U3.2 U3.3 U4.2 U4.3 | length 1544.4
  Top Layer w10: 1758.31,316.59 1768.97,316.59 1782.22,329.84 U4.2@1793.97,329.84 ; U3.3@2050.26,960 2060,960 U3.2@2060,940.63
  Top Layer w20: v1(1680,330) 1681.41,328.59 C8.2@1681.41,252.54 1696.11,267.24 1708.95,267.24 1758.31,316.59 ; 1768.97,316.59 1796.59,316.59 1800,320 1801.02,320 ; C7.2@1998.61,850 1999.53,850 2032.3,882.78 v1(2051.24,882.78) ; v1@2081.99,960 v1(2090,960)
  Bottom Layer w20: v1(1680,330) 1710,360 J2.1@1710,430 1725.74,445.74 1755.74,445.74 1861,551 1866.42,574.27 ; v1@2051.24,882.58 2004.73,836.07 1946.07,836.07 1860,750 1860,583.43 1892.85,550.59 1909.41,550.59 1949.18,590.36 1949.18,592.61 1950,593.43 1950,598.95 1981.4,630.35 1989.18,630.35 2020,661.17 2020,701.57 J3.1@2064.21,745.79 ; v1(2051.24,882.78) 2051.24,946.24 2065,960 v1(2090,960)
Vin: J1.A4-B9 J1.B4-A9 NT1.1 | length 429.8
  Top Layer w20: J1.A4-B9@2307.68,699.29 2214.19,699.29 2200,713.48 2200,820 v1(2190,830) 2248.27,888.27 J1.B4-A9@2307.68,888.27
  Bottom Layer w20: v1(2190,830) 2190.59,830.59 NT1.1@2190.59,883.5
Vout_to_LDO: C3.2 R1.2 R3.1 R7.2 U2.13 U2.15 U2.16 | length 1595.1
  Top Layer w15: U2.13@2291.2,356.56 2316.22,356.56 2342.78,330 2342.78,315 2340.96,313.18 2340.96,290.96 v1(2340,290)
  Top Layer w20: v1(2110.92,494.36) 2124.83,494.36 R7.2@2159.42,528.95 ; R7.2@2159.42,530 R7.2@2159.42,528.95 ; 2248.81,461.81 2298.7,411.92 2329.62,442.85 R1.2@2357.7,442.85 ; R1.2@2358.73,434 C3.2@2358.73,534.82 ; C3.2@2360.18,536.27 2356.44,540 v1(2291.16,540) 2247.29,496.14 2192.23,496.14 R7.2@2159.42,528.95
  Bottom Layer w20: v1(2110.92,494.36) 2110.92,519.87 2220,628.95 2220,672.23 2219.96,689.83 cw(c2259.65,689.92) 2219.96,689.92 cw(c2259.65,689.92) 2220.03,692.25 2220.94,707.71 cw(c2240.9,706.54) 2224.31,717.71 2224.35,717.76 2283.44,804.91 ccw(c2266.89,816.14) 2286.89,816.14 2286.89,863.11 2244,906 2244,909.29 2219.96,933.32 2219.96,986.52 2223.67,990.23 2223.67,1006.8 2191.05,1039.42 R3.1@2190,1039.42 ; v1(2291.16,540) 2322.12,540 2350,512.12 2350,300 v1(2340,290)
Vref: C10.2 R18.1 R19.2 U5.18 | length 434.4
  Top Layer w10: U5.18@840,592.39 840.29,592.68 840.29,644.32 880,684.03 C10.2@937.08,684.03 ; R18.1@889.42,770 880,760.58 880,754.03 912.04,721.98 912.04,708.15 936.17,684.03 C10.2@937.08,684.03 ; R19.2@1067.64,718.8 1057.09,729.35 1051.54,729.35 1049.88,731.01 984.98,731.01 938,684.03 C10.2@937.08,684.03
pads on no net: E1.3 E1.4 E1.5 E1.6 E1.8 E1.9 E1.10 E1.11 E1.15 E1.16 E1.17 E1.18 E1.19 E1.20 E1.24 E1.25 E1.26 E1.27 E1.28 E1.29 E1.30 E1.31 E1.32 E1.33 E1.34 E1.$7 J1. J1.1 J1.2 J1.3 J1.4 J1.A6 J1.A7 J1.A8 J1.B6 J1.B7 J1.B8 J4. J6. SW1.3 SW1.4 SW1.5 U2.4 U2.5 U2.6 U2.9 U2.10 U6.2 U6.10 U6.18 U6.19 U6.25 U6.26 U6.27 U6.28 U6.29 U6.32 U6.33 U6.38 U6.39 U6.40 U6.41 U6.45 U7.2 U7.3 U7.13 U7.15 U7.16

## Polygon pours and split planes (outlines as drawn)
DVDD on Layer 3(GND) "DVDD_L03_P011" (solid, pour order 11): 1381.69,-0.11 2388.68,-0.11 ccw(c2388.68,164.91) 2553.69,164.91 2554.29,1398.93 ccw(c2368.93,1398.93) 2368.93,1584.29 1381.69,1584.29
AVDD on Layer 3(GND) "AVDD_L03_P006" (solid, pour order 6): 1035,1095 1035,1240 1185,1240 1185,960 970,745 830,885 830,890
DGND on Top Layer "DGND_L01_P014" (solid, pour order 14): 2388.58,1570 cw(c2388.58,1470) 2459.29,1540.71 2510.71,1489.29 cw(c2440,1418.58) 2540,1418.58 2540,151.42 cw(c2440,151.42) 2510.71,80.71 2479.29,49.29 cw(c2408.58,120) 2408.58,20 1150,20 ccw(c1101.72,68.28) 1170,68.28 1170,1570
AGND on Top Layer "AGND_L01_P012" (solid, pour order 12): 1140,770 1140,320 860,40 121.42,40 cw(c121.42,140) 50.71,69.29 30,90 cw(c54.14,114.14) 20,114.14 20,770 50,770 20,770 50,770
GND on Bottom Layer "GND_L04_P009" (solid, pour order 9): -6.13,160.07 -6.13,1424.72 cw(c151.35,1424.72) 151.35,1582.2 2368.59,1582.2 cw(c2368.59,1396.84) 2553.95,1396.84 2553.35,162.81 cw(c2388.34,162.81) 2388.34,-2.2 151.66,2.2 151.66,2.27 cw(c151.66,160.07)
GND on Layer 2(GND) "GND_L02_P010" (solid, pour order 10): -8.15,154.78 -8.15,1419.43 cw(c149.33,1419.43) 149.33,1576.91 2366.57,1576.91 cw(c2366.57,1391.54) 2551.94,1391.54 2551.33,157.52 cw(c2386.32,157.52) 2386.32,-7.49 149.65,-3.09 149.65,-3.02 cw(c149.65,154.78)

## Keep-outs
Keep-Out Layer:
  region: 274.8,870 274.8,1410 0,1410 0,870
  lines w10: 150.32,0 2389.82,0 ccw(c2389.82,162.06) 2551.88,162.06 2552.6,1394.64 ccw(c2367.24,1394.64) 2367.24,1580 150,1580 ccw(c150,1422.52) -7.48,1422.52 -7.48,157.87 ccw(c150.32,157.87) 150.32,0.07

## Other copper
Multi-Layer:
  pour cut-out: -40,880 -40,1420 234.8,1420 234.8,880

## Silkscreen, mask and mechanical layers (free items; w line width, h text height)
Top Overlay:
  drawing of 58 lines, arcs and shapes, not listed
Bottom Overlay:
  drawing of 86 lines, arcs and shapes, not listed
  text "A" at 1454,1476 h30
  text "A" at 1494,1476 h25
  text "A" at 1534,1476 h20
  text "A" at 1436,1444 h35 r180
  text "A" at 1474,1436 h25 r180
  text "A" at 1524,1436 h20 r180
  text "3V3" at 1134,364 h30 r90
  text "GND" at 1234,364 h30 r90
  text "CLK" at 1434,364 h30 r90
  text "DIO" at 1334,354 h30 r90
  text "R" at 1506,286 h30 r270

## Text inside footprints (layer, text, board x,y; h text height)
E1: Top Overlay "TX" at 285.67,929.06 h32 r90; Top Overlay "RX" at 344.72,929.06 h32 r90; Top Overlay "CTS" at 403.78,929.06 h32 r90; Top Overlay "RTS" at 462.83,929.06 h32 r90; Top Overlay "RST" at 876.22,929.06 h32 r90; Top Overlay "+3.3V" at 935.28,929.06 h32 r90; Top Overlay "GND" at 1010,950 h24 r90; Top Overlay "D-" at 1015.67,1140.28 h32 r90; Top Overlay "D+" at 1015.67,1215.28 h32 r90; Top Overlay "GND" at 1018.15,1285.28 h24 r90; Top Overlay "KEY" at 950.67,1245.28 h32 r90; Top Overlay "LED" at 890.67,1240.28 h32 r90; Top Overlay "IO2" at 825.67,1240.28 h32 r90; Top Overlay "IO3" at 770.67,1250.28 h32 r90; Top Overlay "IO4" at 710.67,1255.28 h32 r90; Top Overlay "IO5" at 650.67,1250.28 h32 r90; Top Overlay "IO6" at 590.67,1250.28 h32 r90; Top Overlay "IO7" at 535.67,1250.28 h32 r90; Top Overlay "IO8" at 475.67,1250.28 h32 r90; Top Overlay "IO9" at 420.67,1245.28 h32 r90; Top Overlay "IO10" at 360.67,1240.28 h32 r90; Top Overlay "IO11" at 300.67,1250.28 h32 r90